# Altium PCB KPILL.PcbDoc
Units mm, origin at the board's own origin, x right, y up, seen from the top; angles counter-clockwise.
Board outline 21.24 x 56 mm, 2 copper layers (Top Layer, Bottom Layer); 30 components, 46 nets, 154 pads, 21 vias.
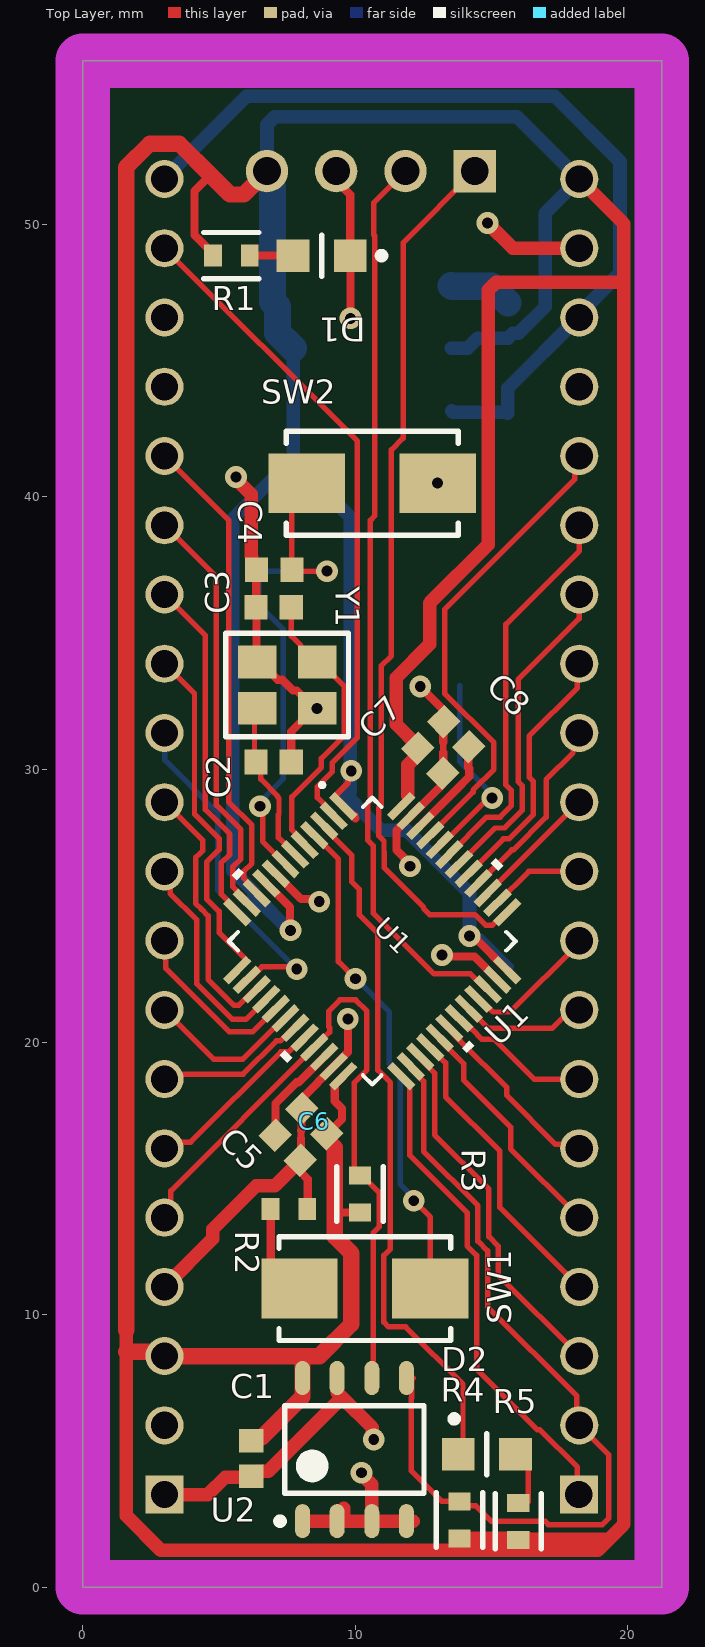
[diagram p0: Top Layer view]
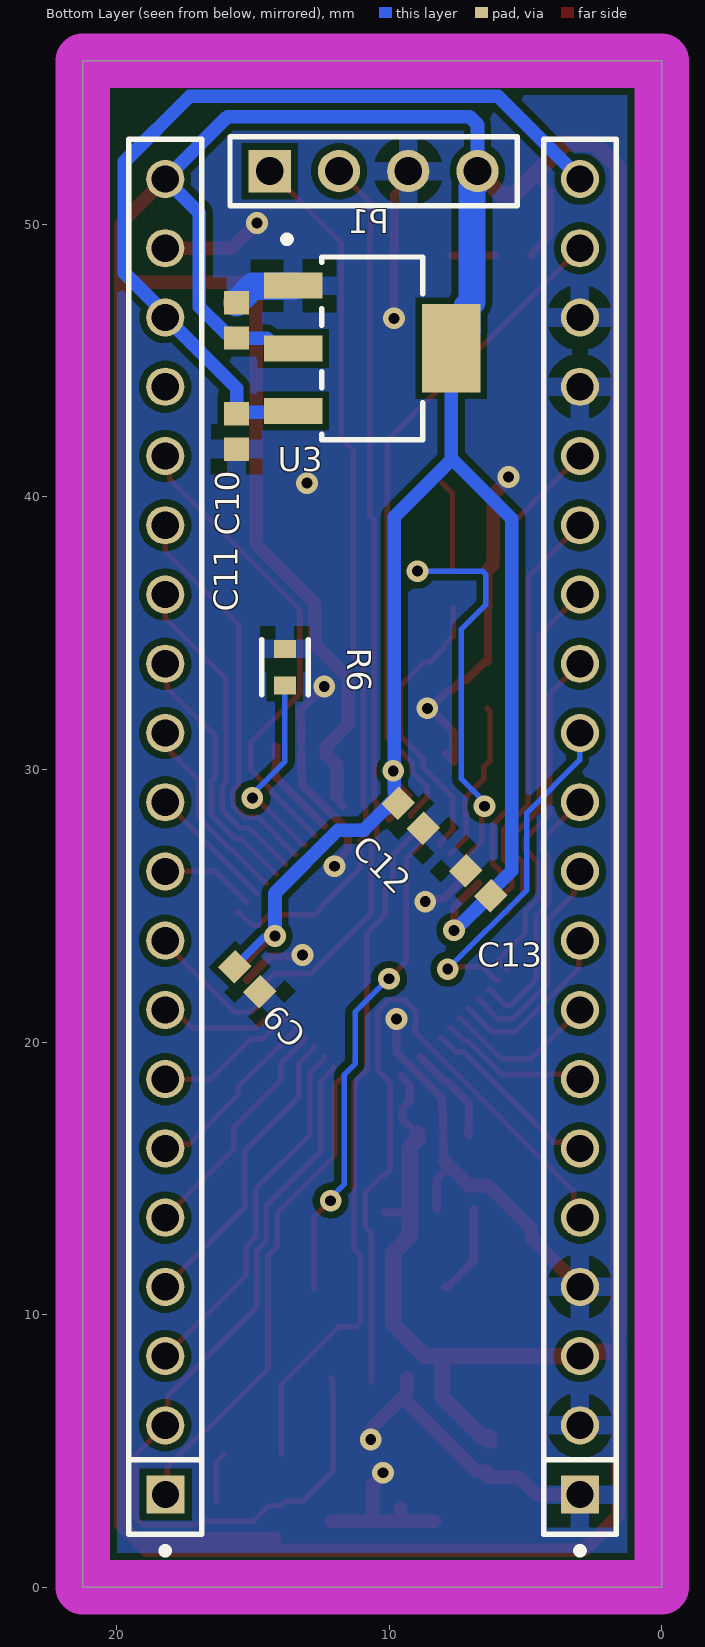
[diagram p1: Bottom Layer view, seen from below]
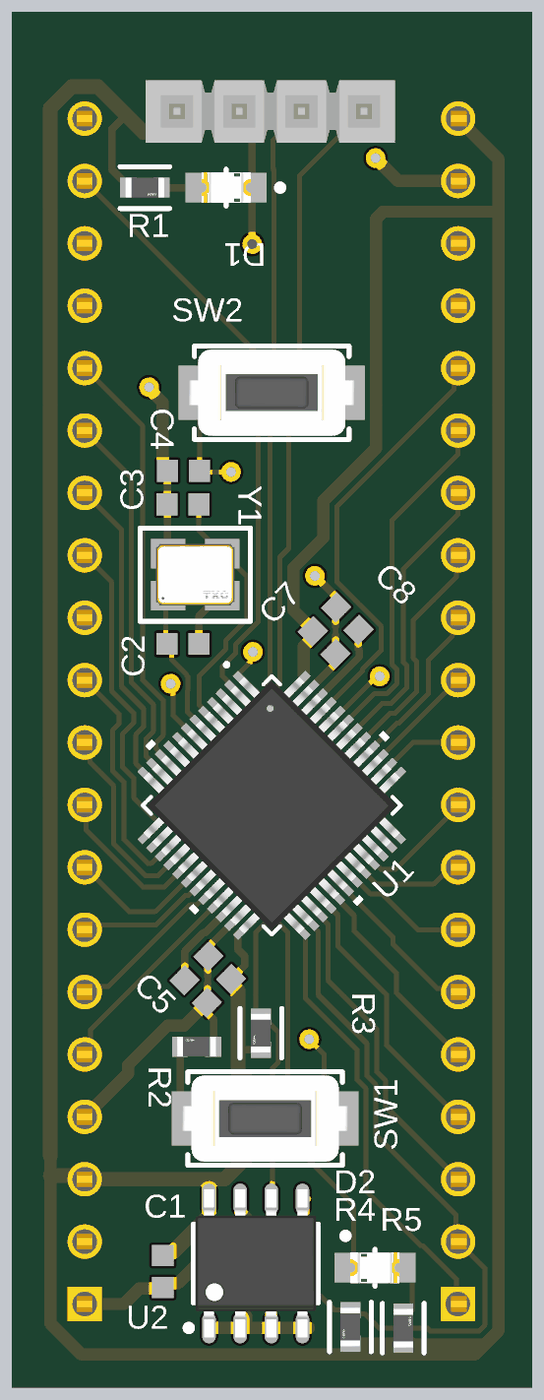
[diagram p2: 3D render of the assembled board from above, using the file's embedded part models]
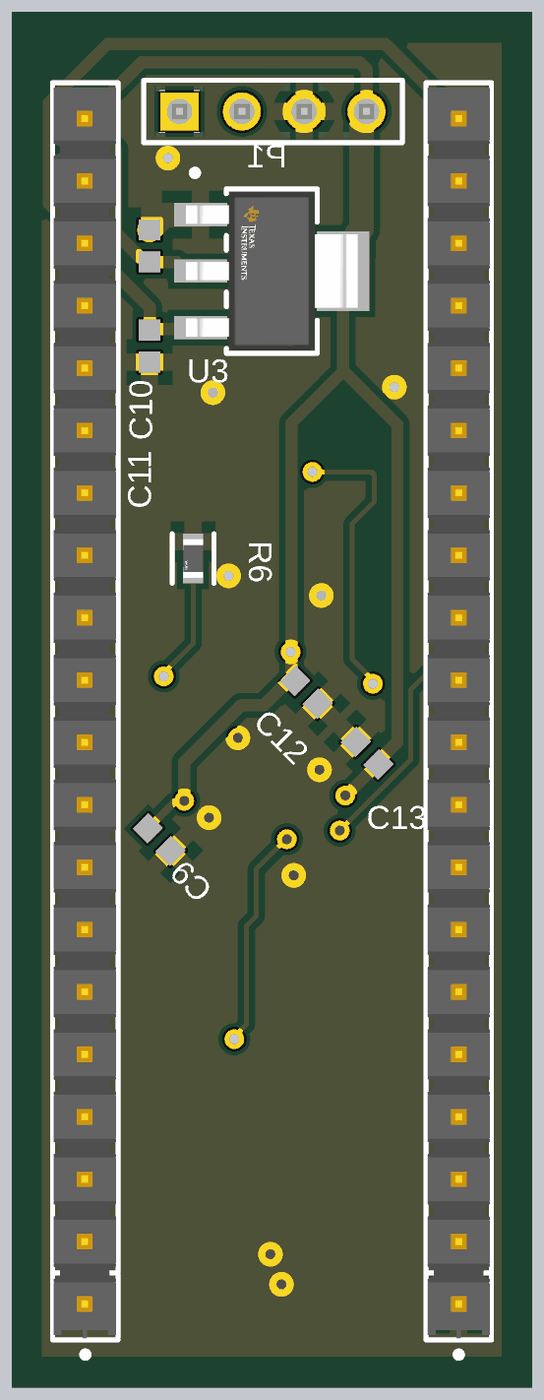
[diagram p3: 3D render of the assembled board from below, using the file's embedded part models]

## Layer stack, top to bottom
Top Solder: solder mask 0.0102, Solder Resist, Dk 3.5
Top Layer: signal copper 0.0356
Dielectric 1: dielectric 0.32, FR-4, Dk 4.8
Bottom Layer: signal copper 0.0356
Bottom Solder: solder mask 0.0102, Solder Resist, Dk 3.5

## Board outline
0,0 0,56 21.24,56 21.24,0

## Design rules (kind name [scope] priority, off if disabled: settings)
AcuteAngle [All] p1: minimum=7.50000000000000E+0001 checktracksonly=FALSE
BoardOutlineClearance [All] p1: gap=0.4 ignorepadtopadclearanceinfootprint=FALSE
Clearance "Stitching GND" [IsStitchingVia and InNet('GND') vs (IsVia and (Not IsStitchingVia)) Or IsPad] p1: gap=0.3 ignorepadtopadclearanceinfootprint=FALSE
Clearance Poly_Clearance [InPolygon] p2: gap=0.25 ignorepadtopadclearanceinfootprint=FALSE
Clearance [All] p3: gap=0.2 ignorepadtopadclearanceinfootprint=FALSE except(0.3: Arc-THPad Arc-Hole Track-THPad Track-Hole SMDPad-THPad SMDPad-Hole THPad-THPad THPad-Via THPad-Fill THPad-Poly THPad-Region THPad-Hole Via-Via Via-Fill Via-Poly Via-Region Via-Hole Fill-Hole Poly-Hole Region-Hole)
ComponentClearance [All] p1 off: gap=0.254 collisioncheckmode=3 verticalgap=0.254 showdistances=FALSE
ComponentOrientations [HasFootprint('No Footprint')] p1: allowedrotations=1
HoleSize [All] p1: absolutevalues=TRUE maxlimit=50 minlimit=0.4 maxpercent=80.000 minpercent=20.000
HoleToHoleClearance [All] p1: gap=0.3 allowstackedmicrovias=TRUE
MinimumAnnularRing [All] p1: minimumring=0.2
MinimumSolderMaskSliver [All] p1: minsoldermaskwidth=0.2
NetsToIgnore [All] p1:
PasteMaskExpansion [All] p1: expansion=0 thpadusetoppaste=TRUE percent=15.000000
PlaneConnect [All] p1: pad.planeconnectstyle=Relief pad.reliefexpansion=0.5 pad.reliefentries=4 pad.reliefconductorwidth=0.7 pad.reliefairgap=0.5 via.planeconnectstyle=Direct via.reliefexpansion=0.508 via.reliefentries=4 via.reliefconductorwidth=0.254 via.reliefairgap=0.254
PolygonConnect [All] p1: thpad.connectstyle=Relief thpad.reliefconductorwidth=0.7 thpad.reliefentries=4 thpad.polygonreliefangle="90 Angle" thpad.airgapwidth=0.5 smdpad.connectstyle=Relief smdpad.reliefconductorwidth=0.7 smdpad.reliefentries=4 smdpad.polygonreliefangle="90 Angle" smdpad.airgapwidth=0.5 via.connectstyle=Direct via.reliefconductorwidth=0.5 via.reliefentries=4 via.polygonreliefangle="45 Angle" via.airgapwidth=0.3
PolygonConnect PolygonBotLayer [All vs InPolygon] p2: thpad.connectstyle=Relief thpad.reliefconductorwidth=0.7 thpad.reliefentries=4 thpad.polygonreliefangle="90 Angle" thpad.airgapwidth=0.5 smdpad.connectstyle=Relief smdpad.reliefconductorwidth=0.7 smdpad.reliefentries=4 smdpad.polygonreliefangle="90 Angle" smdpad.airgapwidth=0.5 via.connectstyle=Direct via.reliefconductorwidth=0.254 via.reliefentries=4 via.polygonreliefangle="90 Angle" via.airgapwidth=0.254
PolygonConnect PolygonTopLayer [All vs InPolygon] p3: thpad.connectstyle=Relief thpad.reliefconductorwidth=0.7 thpad.reliefentries=4 thpad.polygonreliefangle="90 Angle" thpad.airgapwidth=0.5 smdpad.connectstyle=Relief smdpad.reliefconductorwidth=0.7 smdpad.reliefentries=4 smdpad.polygonreliefangle="90 Angle" smdpad.airgapwidth=0.5 via.connectstyle=Direct via.reliefconductorwidth=0.254 via.reliefentries=4 via.polygonreliefangle="90 Angle" via.airgapwidth=0.254
RoutingCorners [InNet('No Net')] p1: cornerstyle=45-Degree minsetback=2.54 maxsetback=2.54
RoutingVias [All] p1: holewidth=0.5 width=0.9 viastyle="Through Hole" minholewidth=0.4 minwidth=0.8 maxholewidth=2 maxwidth=3
SilkToSilkClearance [All] p1: silktosilkclearance=0
SilkToSolderMaskClearance [IsPad] p1: minsilkscreentomaskgap=0.2 clearancetoexposedcopper=TRUE
SolderMaskExpansion [All] p1: expansion=0.102 istentingtop=FALSE useseparateexpansions=TRUE expansionbottom=0.102 istentingbottom=FALSE
SupplyNets "Schematic Supply Nets_2" [InNet('+3V3')] p1: voltage=0.000
SupplyNets "Schematic Supply Nets_1" [InNet('+5')] p2: voltage=0.000
SupplyNets "Schematic Supply Nets" [InNet('GND')] p3: voltage=0.000
UnRoutedNet [All] p1: checkbadconnections=TRUE
Width [All] p1: maxlimit=10 minlimit=0.2 preferedwidth=0.254
20 further rules are at their usual default settings.

## Classes and differential pairs
component class KPILL: C1 C3 C5 C6 C7 C8 C9 C13 D2 J1 J2 P1 R2 R3 R6 SW2 U2 Y1

## Components (designator, comment, footprint, x,y, rotation, side; value= is the part's Value field where it differs from the comment)
C1 "100nF" CAPC1608X90X35LL15T15 6.182,4.725 r90 top
C2 "10pF" CAPC1608X90X35LL15T15 7,30.275 r180 top locked
C3 "10pF" CAPC1608X90X35LL15T15 7,35.95 r180 top locked
C4 "100nF" CAPC1608X90X35LL15T15 7.025,37.325 r180 top
C5 "2.2uF" CAPC1608X90X35LL15T15 7.525,16.127 r135 top locked
C6 "100nF" CAPC1608X90X35LL15T15 8.5,17.095 r315 top locked
C7 "100nF" CAPC1608X90X35LL15T15 12.75,30.325 r135 top locked
C8 "2.2uF" CAPC1608X90X35LL15T15 13.7,31.3 r315 top locked
C9 "100nF" CAPC1608X90X35LL15T15 15.203,22.306 r45 bottom
C10 "2.2uF" CAPC1608X90X35LL15T15 15.6,46.475 r270 bottom
C11 "2.2uF" CAPC1608X90X35LL15T15 15.6,42.4 r90 bottom
C12 "100nF" CAPC1608X90X35LL15T15 9.206,28.296 r45 bottom
C13 "100nF" CAPC1608X90X35LL15T15 6.731,25.821 r225 bottom
D1 "SML-LX0805UWC-TR" FP-SML-LX0805UWC-TR-MFG 8.76,48.85 r180 top
D2 "SML-LX0805UWC-TR" FP-SML-LX0805UWC-TR-MFG 14.825,4.875 r0 top
J1 "TSW-120-05-G-S" FP-TSW-120-05-G-S-MFG#1 18.215,27.53 r90 bottom locked
J2 "TSW-120-05-G-S" FP-TSW-120-05-G-S-MFG#2 3,27.53 r90 bottom locked
P1 "MTSW-104-07-G-S-170" SMTC-MTSW-104-07-X-S-170 14.377,51.95 r180 bottom locked
R1 "10K" FP-AT0603-IPC_C 5.45,48.85 r0 top
R2 "10K" FP-AT0603-IPC_C 7.559,13.875 r180 top
R3 "10K" FP-AT0603-IPC_C 10.175,14.425 r270 top
R4 "10K" FP-AT0603-IPC_C 13.822,2.465 r270 top
R5 "10K" FP-AT0603-IPC_C 15.977,2.417 r90 top
R6 "10K" FP-AT0603-IPC_C 13.825,33.75 r270 bottom
SW1 "USER" FP-147873-2-MFG 10.35,10.952 r180 top locked
SW2 "Reset Button" FP-147873-2-MFG 10.62,40.5 r0 top
U1 "STM32H503CBT6" LQFP48-7x7mm_STM 10.62,23.7 r315 top locked
U2 "AT24C512C-SSHD-T" ATML-8S1_L 9.968,5.051 r90 top
U3 "TLV76133DCYR" FP-DCY0004A-MFG 10.619,45.45 r180 bottom
Y1 "7M16000025" FP-7M-MFG 7.5,33.094 r0 top locked

## Footprints (in the part's own frame and the unit in brackets; to place one, negate y for a bottom-side part, rotate by r counter-clockwise, add the part's x,y. Pads: shape width x height; smd on the part's side, far side on the other; paste and mask are expansions set on the pad)
ATML-8S1_L [mm] "SOIC, 8-Leads, Body 5.1x4mm, Pitch 1.27mm, IPC High Density"
  oval 1.25x0.55 smd: 1(-2.625,1.905) 2(-2.625,0.635) 3(-2.625,-0.635) 4(-2.625,-1.905) 5(2.625,-1.905) 6(2.625,-0.635) 7(2.625,0.635) 8(2.625,1.905)
  silkscreen extent -2.75,-2.55 1.6,2.85, body extent -3.01,-2.46 3.01,2.46, height 1.75
CAPC1608X90X35LL15T15 [mm] "Chip Capacitor, 2-Leads, Body 1.60x0.81mm, IPC High Density"
  rect 0.85x0.9 smd: 1(-0.65,0) 2(0.65,0)
  body extent -0.88,-0.48 0.87,0.48, height 0.9
FP-7M-MFG [mm]
  rect 1.4x1.2 smd paste+0 mask+0: 1(-1.1,-0.85) 2(1.1,-0.85) 3(1.1,0.85) 4(-1.1,0.85)
  silkscreen extent -2.25,-1.9 2.25,1.9, body extent -1.9,-1.55 1.9,1.55, height 0.25
FP-147873-2-MFG [mm]
  rect 2.8x2.2 smd paste+0 mask+0: 1(-2.4,0) 2(2.4,0)
  silkscreen extent -3.15,-1.9 3.15,1.9, body extent -3.9,-2 3.9,2, height 0.25
FP-AT0603-IPC_C [mm]
  rect 0.659x0.812 smd paste+0 mask+0: 1(-0.677,0) 2(0.677,0)
  silkscreen extent -1.01,-0.85 1.01,0.85, body extent -1.11,-0.55 1.11,0.55, height 0.25
FP-DCY0004A-MFG [mm]
  rect 2.15x0.95 smd paste+0 mask+0: 1(-2.9,2.3) 2(-2.9,0) 3(-2.9,-2.3)
  rect 2.15x3.25 smd paste+0 mask+0: 4(2.9,0)
  silkscreen extent -3.26,-3.35 1.85,4.12, body extent -3.5,-3.25 3.5,3.25, height 1.8
FP-SML-LX0805UWC-TR-MFG [mm]
  rect 1.2x1.2 smd paste+0 mask+0: 1(-1.05,0) 2(1.05,0)
  silkscreen extent -2.33,-0.75 0,0.75, body extent -1.75,-0.85 1.75,0.85, height 0.25
FP-TSW-120-05-G-S-MFG#1 [mm]
  rect 1.4x1.4 hole 1 paste-2539.97 mask+0: 1(-24.13,-0.015)
  round 1.4 hole 1 paste-2539.97 mask+0: 2(-21.59,0) 3(-19.05,0) 4(-16.51,0) 5(-13.97,0) 6(-11.43,0) 7(-8.89,0) 8(-6.35,0) 9(-3.81,0) 10(-1.27,0) 11(1.27,0) 12(3.81,0) 13(6.35,0) 14(8.89,0) 15(11.43,0) 16(13.97,0) 17(16.51,0) 18(19.05,0) 19(21.59,0) 20(24.13,0)
  silkscreen extent -26.31,-1.34 25.59,1.34, body extent -25.53,-1.25 25.4,1.3, height 5.54
FP-TSW-120-05-G-S-MFG#2 [mm]
  rect 1.4x1.4 hole 1 paste-2539.97 mask+0: 1(-24.13,0)
  round 1.4 hole 1 paste-2539.97 mask+0: 2(-21.59,0) 3(-19.05,0) 4(-16.51,0) 5(-13.97,0) 6(-11.43,0) 7(-8.89,0) 8(-6.35,0) 9(-3.81,0) 10(-1.27,0) 11(1.27,0) 12(3.81,0) 13(6.35,0) 14(8.89,0) 15(11.43,0) 16(13.97,0) 17(16.51,0) 18(19.05,0) 19(21.59,0) 20(24.13,0)
  silkscreen extent -26.31,-1.33 25.59,1.34, body extent -25.53,-1.27 25.4,1.27, height 5.54
LQFP48-7x7mm_STM [mm]
  rect 1.194x0.3 smd paste+0 mask+0: 1(-4.25,2.75) 2(-4.25,2.25) 11(-4.25,-2.25) 12(-4.25,-2.75) 25(4.25,-2.75) 26(4.25,-2.25) 27(4.25,-1.75) 31(4.25,0.25)
  rect 1.194x0.295 smd paste+0 mask+0: 3(-4.25,1.75) 4(-4.25,1.25) 5(-4.25,0.75) 6(-4.25,0.25) 7(-4.25,-0.25) 8(-4.25,-0.75) 9(-4.25,-1.25) 10(-4.25,-1.75)
  rect 0.295x1.194 smd paste+0 mask+0: 13(-2.75,-4.25) 14(-2.25,-4.25) 15(-1.75,-4.25) 16(-1.25,-4.25) 17(-0.75,-4.25) 18(-0.25,-4.25) 19(0.25,-4.25) 20(0.75,-4.25) 21(1.25,-4.25) 22(1.75,-4.25) 23(2.25,-4.25) 24(2.75,-4.25) 40(1.25,4.25) 41(0.75,4.25) 44(-0.75,4.25) 45(-1.25,4.25)
  rect 1.194x0.29 smd paste+0 mask+0: 28(4.25,-1.25) 29(4.25,-0.75) 30(4.25,-0.25) 32(4.25,0.75) 33(4.25,1.25) 34(4.25,1.75) 35(4.25,2.25) 36(4.25,2.75)
  rect 0.3x1.194 smd paste+0 mask+0: 37(2.75,4.25) 38(2.25,4.25) 39(1.75,4.25) 42(0.25,4.25) 43(-0.25,4.25) 46(-1.75,4.25) 47(-2.25,4.25) 48(-2.75,4.25)
  silkscreen extent -5.43,-5.35 5.35,5.35, body extent -4.5,-4.5 4.5,4.5, height 1.6
SMTC-MTSW-104-07-X-S-170 [mm] "Assembly .025\" [.64] SQ Post Terminal Strip, 1x4 Pins, Vertical, 2.54mm Pitch, Male"
  rect 1.55x1.55 hole 1.02: 1(0,0)
  round 1.55 hole 1.02: 2(2.54,0) 3(5.08,0) 4(7.62,0)
  silkscreen extent -1.46,-1.27 9.08,1.27, body extent -1.27,-1.27 8.89,1.27, height 4.06

## Part data
C1 C2 C3 C4 C5 C6 C7 C8 C9 C10 C11 C12 C13: library part CMP-2006-04453-1, Manufacturer="AVX Interconnect / Elco", Part Number=06035C682KAT4A
D1 D2: library part CMP-00229-00139794-1, "SML-LX0805UWC-TR White LED, 0805 Diffused, Rectangle Lens SMD package", Case/Package=0805, Forward Current=20mA, Forward Voltage=3.5V, Illumination Color=White, Lens Color="Clear, Yellow", Max Operating Temperature=85°C, Min Operating Temperature=-40°C, Power Rating=120mW, Approvals="CSA, UL", Luminous Intensity=150mcd, Mount="Surface Mount", NexarPartId=139794, Number of LEDs=1, RoHS=Compliant, Viewing Angle=120°
J1 J2: library part CMP-00575-00271415-1, "TSW-120-05-G-S Headers & Wire Housings Classic PCB Header Strips, 0.100 pitch", Color=Black, Manufacturer Lifecycle Status=PRODUCTION, Connector Type="Male Pin", Contact Material=Bronze, Contact Mating Length=2.667mm, Contact Plating=Gold, Gender=Male, Height=2.54mm, Housing Color=Black, Housing Material=Plastic, Lead Free="Lead Free", Lead Pitch=2.54mm, Length=50.8mm, Lifecycle Status=Production, Mount="Through Hole", NexarPartId=271415, Number of Contacts=20, Number of Positions=20, Number of Rows=1, Pitch=2.54mm, REACH SVHC="No SVHC", RoHS=Compliant, Termination=Solder, Width=2.54mm
P1: library part CMP-1024-00104-1, "Modified .025\" SQ Post Header, Through-hole, Vertical, -55 to 125 degC, 2.54 mm Pitch, 4-Pin, Male, RoHS", Manufacturer=Samtec, Temperature Range="-55 to 125 degC", ComponentLink1Description="Manufacturer URL", ComponentLink1URL=http://www.samtec.com, ComponentLink2Description=Datasheet, ComponentLink2URL=http://www.samtec.com/documents/webfiles/pdf/MTSW.PDF, ComponentLink3Description="Package Specification", ComponentLink3URL=http://www.samtec.com/documents/webfiles/cpdf/MTSW-XXX-XX-X-X-XXXX-XX-XXX-MKT1.pdf, DatasheetVersion=F-214, Mounting Technology=Through-hole, Orientation=Vertical, PackageDescription="Assembly .025\" [.64] SQ Post Terminal Strip", PackageReference=MTSW-104-07-X-S-170, PackageVersion="BI, 2/1987", PartNumber=MTSW-104-07-G-S-170, Pitch="2.54 mm", RoHS=True
R1 R2 R3 R4 R5 R6: library part CMP-03412-014529-2, "Thin Film Chip Resistors Automotive Grade 10kΩ 0.5% 50ppm/°C 0603", Case Code (Imperial)=0603, Case Code (Metric)=1608, Max Operating Temperature=155°C, Max Power Dissipation=100mW, Min Operating Temperature=-55°C, Ratings=AEC-Q200, Resistance=10kR, Resistor Type="Thin Film", Temperature Coefficient=50ppm/°C, Tolerance=0.5%, Case/Package=0603, Features="Moisture Resistant", Height=0.022inch, Length=0.063inch, Number of Terminations=2, Packaging="Cut Tape", RoHS Compliant=Yes, Series=AT, Width=0.032inch
SW1 SW2: library part CMP-03402-000024-1, "SWITCH TACTILE SPST-NO 0.05A 24V", Case/Package=SMD/SMT, Color=Black, Contact Current Rating=50mA, Contact Resistance=100mR, Max Operating Temperature=85°C, Max Voltage Rating (DC)=12V, Min Operating Temperature=-35°C, Operating Force=1.77N, Package Quantity=1, Actuator Length=0.031inch, Actuator Material=Polyphenylene, Contact Material="Copper Alloy", Contact Plating=Silver, Current Rating=50mA, Depth=6.8mm, Electrical Life=40000Cycles, ELV=Compliant, Height=4.3mm, Housing Material=Thermoplastic, Illumination Type=Non-Illuminated, Lead Free="Lead Free", Length=3.5mm, Material=Polyamide, Max Current Rating=50mA, Mechanical Life=40000Cycles, Mount="Surface Mount", Orientation=Straight, Packaging="Tape and Reel", Radiation Hardening=No, RoHS Compliant=Yes, Series="FSMJM, Alcoswitch", Size=6mm, Switch Function=Off-Mom, Switch Travel=0.25mm, Termination=J-Bend, Throw Configuration=SPST, Type=Switch, Voltage Rating (DC)=12V
U1: "High-performance, Arm Cortex-M33, MCU with 128-Kbyte Flash, 32-Kbyte RAM, 250 MHz CPU", Manufacturer_Name=STMicroelectronics, Copyright="Copyright (C) 2025 Ultra Librarian. All rights reserved.", Manufacturer_Part_Number=STM32H503CBT6, RefDes=RefDes, Type=Type
U2: library part CMP-2000-05801-1, "512-Kbit (65,536 x 8), 2-Wire Bus Serial EEPROM with Write Protect, 2.5 to 5.5 V, -40 to 85 degC, 8-Pin SOIC (8S1), RoHS, Tape and Reel", Manufacturer=Atmel, Maximum Operating Frequency=1MHz, Operating Temperature=-40to85°C, Package=8SOIC, Package Description="8-Pin Small Outline Integrated Circuit, Body 4.925 x 3.9 mm, Pitch 1.27 mm", Package Reference=8S1, Typical Operating Supply Voltage=3.3, Category=EEPROM, Data Retention=40Year, Datasheet URL=http://www.atmel.com/Images/Atmel-8720-SEEPROM-AT24C512C-Datasheet.pdf, Datasheet Version="Rev. 8720G, 09/2015", Density=512Kb, Hardware Data Protection=Yes, Interface Type=Serial(2-Wire), Manufacturer URL=http://www.atmel.com/, Maximum Random Access Time=550ns, Mounting Technology=SurfaceMount, Organization=64Kx8
U3: library part CMP-00370-135533165-1, "TLV76133DCYR 1A 16V high-PSRR linear voltage regulator 4-SOT-223 -40 to 125", Case/Package=SOT-223, Dropout Voltage=900mV, Manufacturer Lifecycle Status=ACTIVE, Max Junction Temperature (Tj)=125°C, Max Supply Voltage=16V, Min Operating Temperature=-40°C, Min Supply Voltage=4.8V, Nominal Supply Current=65µA, Output Current=1A, Output Voltage=3.3V, Accuracy=1%, ComponentLink1Description="Supplier Link", ComponentLink1URL=https://lionelectronic.ir/products/6357-TLV76133DCYR, Height=1.8mm, Length=6.5mm, Lifecycle Status=Production, Max Operating Temperature=125°C, NexarPartId=135533165, Number of Outputs=1, Number of Pins=4, P.N=TLV76133DCYR, Thickness=1.6mm, Width=3.5mm
Y1: library part CMP-18717-000306-1, "Crystal 16MHz, 10ppm, 20pF, 60Ω", Case/Package=SMD/SMT, Frequency=16MHz, Frequency Stability=10ppm, Load Capacitance=20pF, Max Operating Temperature=70°C, Min Operating Temperature=-20°C, Frequency Tolerance=10ppm, Height=0.031inch, Length=0.126inch, Mount="Surface Mount", Width=0.098inch

## Via types
v1: diameter 0.8, hole 0.4, Top Layer to Bottom Layer, 21 vias

## Nets (pads, with @x,y where several pads share a name; then routed paths per layer and width w, separated by ;. In a path a pad name is that pad's centre, name@x,y a point inside that pad or via, vN(x,y) a via of type N, cw(c..) or ccw(c..) an arc to the next point about the centre after c; other vN are vias at no path point)
+3V3: C1.2 C6.2 C7.2 C9.2 C10.2 C12.2 C13.2 J1.20 J2.3 P1.4 R1.1 R3.2 R4.2 R5.1 U1.1 U1.9 U1.24 U1.36 U1.48 U2.8 U3.2 U3.4 | length 268.5
  Top Layer w0.219: U1.1@9.551,28.715 9.243,29.023 9.739,29.519 9.739,29.839 v1(9.85,29.95) ; U1.1 U1.1@9.559,28.655 ; 10.002,28.207 U1.1@10.002,28.334
  Top Layer w0.3: 4.687,51.812 4.1,51.225 4.1,49.6 4.773,48.927 R1.1 ; U1.9 7.255,25.297 7.602,24.95 7.602,24.123 v1(7.625,24.1) ; C6.2 8.942,16.617 8.942,16.229 9.084,16.086 ; C6.2@9.047,16.703 9.513,17.168 9.513,17.565 9.243,17.834 9.243,18.434 U1.24 ; 9.25,13.75 9.252,13.748 R3.2 ; U1.1 10.002,28.207 ; U1.48 11.922,28.891 U1.48@11.922,29.032 ; v1(14.186,23.886) 14.282,23.79 14.419,23.79 U1.36
  Top Layer w0.5: 1.6,9.43 1.6,8.633 1.6,2.622 2.871,1.351 18.894,1.351 19.293,1.75 ; U1.48@11.922,29.032 11.922,30.168 12.308,30.555 12.308,30.848 11.5,31.656 11.5,33.368 12.725,34.593 12.725,36.103 14.87,38.248 14.87,47.577 15.163,47.87 19.85,47.87 ; R4.2@14.175,1.788 16.35,1.788 16.388,1.75 19.293,1.75 ; J1.20 19.815,50.06 ; 19.85,48.937 19.85,47.87 ; 19.85,48.987 19.85,50.025 ; 19.293,1.75 19.85,2.306 19.85,47.87
  Top Layer w0.6: 1.6,8.633 2.847,8.633 J2.3 8.063,8.48 ; 1.6,9.43 1.6,52.098 2.462,52.96 3.538,52.96 4.687,51.812 5.404,51.094 5.902,51.094 P1.4 ; C1.2@6.332,5.375 6.332,5.5 6.575,5.5 8.063,6.988 8.063,8.48 ; C6.2 8.942,16.617 8.942,16.441 9.25,16.133 9.25,13.75 9.25,12.859 9.85,12.259 9.85,9.644 8.686,8.48 8.063,8.48
  Bottom Layer w0.3: v1(9.85,29.95) 9.85,29.021 10.116,28.756 10.116,28.553 ; v1(14.186,23.886) 14.243,23.829 14.6,23.829 C9.2
  Bottom Layer w0.5: P1.4 6.758,53.657 7.05,53.95 15.925,53.95 J1.20 16.965,50.41 16.965,46.979 15.986,46 15.775,46 C10.2 14.494,45.825 14.119,45.45 U3.2 ; v1(7.625,24.1) 7.579,24.1 6.317,25.362 C13.2 6.271,25.516 5.5,26.287 5.5,39.2 7.719,41.419 ; U3.4 7.719,41.419 ; v1(14.186,23.886) 14.186,25.466 11.882,27.77 10.943,27.77 10.16,28.553 10.116,28.553 9.913,28.756 C12.2 9.648,28.773 9.648,29.021 9.811,29.185 9.811,39.264 7.719,41.356 7.719,41.419
  Bottom Layer w1: P1.4 6.863,51.845 6.863,51.456 6.962,51.356 6.962,47.161 7.144,46.979 7.144,46.025 U3.4
+5: C11.2 J1.18 J2.20 U3.3 | length 32
  Bottom Layer w0.5: J2.20@3,51.692 6.008,54.7 17.315,54.7 19.708,52.306 19.708,48.213 18.208,46.713 J1.18@18.208,46.587 ; U3.3@13.537,43.15 13.587,43.1 15.568,43.1 15.593,43.075 15.593,43.985 J1.18@18.188,46.58
B7: J1.15 U1.43 | length 14.5
  Top Layer w0.2: U1.43 14.819,28.253 15.31,28.253 15.72,28.663 15.72,29.243 15.525,29.438 15.525,35.325 18.215,38.015 J1.15
B8: J1.16 U1.45 | length 17.7
  Top Layer w0.2: U1.45 14.32,29.167 14.32,29.243 15.078,30.002 15.078,30.982 13.275,32.786 13.275,35.875 18.05,40.65 18.05,41.335 J1.16
GND: C1.1 C2.1 C3.2 C4.2 C5.1 C6.1 C7.1 C8.1 C9.1 C10.1 C11.1 C12.1 C13.1 D1.1 J1.19 J2.1 J2.2 J2.4 J2.17 J2.18 P1.3 R2.1 R6.1 SW2.2 U1.8 U1.23 U1.35 U1.47 U2.1 U2.2 U2.3 U2.4 U2.7 U3.1 Y1.2 Y1.4 | length 68.6
  Top Layer w0.232: 13.223,30.999 13.225,30.997 13.225,30.692 13.227,30.69 13.227,30.626
  Top Layer w0.257: 8.012,16.468 8.012,16.753
  Top Layer w0.3: C4.2@6.363,37.313 6.363,35.963 C3.2 6.375,35.925 6.375,33.969 Y1.4 ; Y1.4@6.5,33.944 7.15,33.294 7.314,33.294 7.714,32.894 7.85,32.894 Y1.2@8.5,32.244 ; U1.8 8.014,25.246 8.579,25.246 v1(8.675,25.15) ; C2.1 C2.1@7.65,30.3 ; C2.1@7.925,30.575 C2.1@7.65,30.3 ; C5.1 7.967,15.65 7.967,15.261 8.252,14.976 R2.1@8.252,13.875 ; C5.1@8.002,15.685 8.002,16.458 8.012,16.468 ; 8.012,16.753 8.023,16.764 8.023,17.517 C6.1@8.04,17.535 ; C6.1@8.058,17.552 8.058,17.956 U1.23 9.73,19.628 9.73,20.845 v1(9.725,20.85) ; v1(8.6,32.244) Y1.2@8.5,32.244 ; P1.3 9.298,51.612 9.81,51.099 D1.1 9.825,48.835 v1(9.825,46.55) ; v1(12,26.45) 12,26.558 11.51,27.049 11.51,27.772 U1.47 13.192,29.454 13.192,29.848 C7.1 13.227,29.883 13.227,30.626 ; v1(12.38,33.045) 13.258,32.166 13.258,31.777 C8.1 13.223,31.742 13.223,30.999 ; v1(13.175,23.2) 13.239,23.136 14.366,23.136 U1.35 ; C2.1@7.65,30.3 7.65,31.394 Y1.2@8.5,32.244
  Top Layer w0.5: J2.1 4.587,3.4 5.225,4.038 C1.1@6.388,4.038 ; J2.4 4.769,12.789 4.769,13.134 6.366,14.731 7.048,14.731 C5.1@7.967,15.65 ; v1(5.625,40.725) 5.625,40.644 6.175,40.094 6.175,37.818 6.2,37.793 6.2,37.5 C4.2 ; C1.1@6.382,4.038 6.382,4.25 6.8,4.25 9.513,6.963 9.343,7.132 9.343,7.666 U2.7 ; U2.1@8.32,2.426 U2.2 9.576,2.426 U2.2@9.576,2.901 ; 9.548,6.927 10.618,5.857 10.618,5.482 v1(10.675,5.425) ; U2.2@9.59,2.426 U2.3 ; v1(10.225,4.2) 10.225,4.147 10.603,3.769 U2.3 ; U2.4@12.13,2.426 U2.4 U2.3 ; v1(14.85,50.05) 15.78,49.12 J1.19
  Bottom Layer w1: U3.1 13.544,47.725 15,47.725 C10.1
  other v1: 13.017,40.503
MCU_NRST: C4.1 SW2.1 U1.7 | length 18.9
  Top Layer w0.2: v1(6.5,28.65) 6.6,28.55 6.6,27.366 U1.7 ; SW2.1@8.05,40.5 7.675,40.125 C4.1 7.725,37.275 v1(8.961,37.275)
  Bottom Layer w0.2: v1(6.5,28.65) 6.5,28.8 7.35,29.65 7.35,35.15 6.45,36.05 6.45,37.158 6.567,37.275 v1(8.961,37.275)
MCU_OSC_IN: C3.1 U1.5 Y1.3 | length 10.6
  Top Layer w0.2: C3.1 7.65,34.894 8,34.544 8,34.444 8.5,33.944 Y1.3 8.7,33.944 9.6,33.044 9.6,31.256 8.75,30.406 8.75,30.076 7.671,28.996 7.671,27.781 8.145,27.306 U1.5
MCU_OSC_OUT: C2.2 U1.6 Y1.1 | length 6
  Top Layer w0.2: C2.2@6.3,30.275 6.3,32.144 Y1.1 ; C2.2 6.533,30.092 6.533,29.642 7.15,29.025 7.15,28.99 7.2,28.94 7.2,28.36 7.177,28.337 7.177,27.496 U1.6
NetD1_2: D2.2 R5.2 | length 1.9
  Top Layer w0.2: D2.2@16.05,4.875 16.35,4.575 R5.2@16.35,3.141
NetD2_2: D1.2 R1.2 | length 1.6
  Top Layer w0.3: R1.2 D1.2
NetR3_2: R2.2 SW1.2 | length 3.3
  Top Layer w0.3: R2.2@6.898,13.875 6.898,11.975 7.848,11.025 SW1.2@7.95,11.025
NetR4_2: R6.2 U1.44 | length 7.3
  Top Layer w0.2: U1.44 13.166,27.236 14.883,28.953 v1(15.02,28.953)
  Bottom Layer w0.2: R6.2 13.825,30.287 15.02,29.092 v1(15.02,28.953)
PA0: J2.16 U1.10 | length 17.7
  Top Layer w0.2: J2.16 5.35,39.15 5.35,28.81 6.2,27.96 6.2,26.559 5.903,26.262 5.903,26.013 6.377,25.538 U1.10
PA1: J2.15 U1.11 | length 15.3
  Top Layer w0.2: J2.15 4.9,37.06 4.9,28.694 5.8,27.794 5.8,26.724 5.503,26.427 5.503,25.706 6.024,25.185 U1.11
PA2: J2.14 U1.12 | length 13
  Top Layer w0.2: J2.14 4.5,34.92 4.5,28.529 5.4,27.629 5.4,26.89 5.075,26.565 5.075,25.426 5.67,24.831 U1.12
PA3: J2.13 U1.13 | length 13
  Top Layer w0.2: J2.13 4.1,32.78 4.1,28.363 5,27.463 5,27.056 4.543,26.599 4.543,25.251 5,24.795 5,24.012 5.986,23.026 5.986,22.955 U1.13
PA4: J2.12 U1.14 | length 12.7
  Top Layer w0.2: U1.14 6.095,22.286 6.569,22.76 7.765,22.76 v1(7.85,22.675)
  Bottom Layer w0.2: J2.12 3.016,31.324 3.016,30.34 4.95,28.406 4.95,25.575 v1(7.85,22.675)
PA5: J2.11 U1.15 | length 9.8
  Top Layer w0.2: J2.11 4.396,27.404 4.396,27.017 4.303,26.924 4.143,26.765 4.143,25.086 4.349,24.88 4.6,24.629 4.6,22.3 5.554,21.346 5.72,21.346 6.307,21.932 U1.15
PA6: J2.10 U1.16 | length 8
  Top Layer w0.2: J2.10 3.209,26.051 3.209,25.454 4.175,24.488 4.175,22.141 5.485,20.831 5.983,20.831 U1.16
PA7: J2.9 U1.17 | length 6.4
  Top Layer w0.2: J2.9 3.049,23.671 3.049,22.701 5.375,20.375 6.234,20.375 U1.17
PA8: J1.5 U1.29 | length 8.7
  Top Layer w0.2: U1.29 13.095,20.094 13.975,19.214 13.975,18.6 15.698,16.877 15.698,16.077 J1.5
PA9: J1.6 U1.30 | length 6.8
  Top Layer w0.2: U1.30 13.448,20.447 13.847,20.048 15.557,18.338 15.557,18.043 17.35,16.25 18.065,16.25 J1.6
PA10: J1.7 U1.31 | length 5.3
  Top Layer w0.2: U1.31 13.873,20.872 14.272,20.473 14.644,20.1 15.1,20.1 16.56,18.64 J1.7
PA11: J1.8 U1.32 | length 4.6
  Top Layer w0.2: U1.32 14.881,20.5 17.21,20.5 17.89,21.18 J1.8
PA12: J1.9 U1.33 | length 5
  Top Layer w0.2: U1.33 14.58,21.579 15.054,21.104 15.679,21.104 18.215,23.64 J1.9
PA15: J1.10 U1.38 | length 3.5
  Top Layer w0.2: U1.38 16.362,26.26 J1.10
PB0: J2.8 U1.18 | length 5.8
  Top Layer w0.2: J2.8 4.805,19.375 5.871,19.375 7.367,20.872 U1.18
PB1: J2.7 U1.19 | length 5.6
  Top Layer w0.2: J2.7 3.185,18.825 5.886,18.825 7.105,20.043 7.246,20.043 7.721,20.518 U1.19
PB2: J2.6 U1.20 | length 6.8
  Top Layer w0.2: J2.6 3.23,16.33 3.957,16.33 7.271,19.643 7.553,19.643 8.074,20.164 U1.20
PB3: J1.11 U1.39 | length 4.7
  Top Layer w0.2: U1.39 14.873,25.468 18.205,28.8 J1.11
PB4: J1.12 U1.40 | length 7.1
  Top Layer w0.2: U1.40 15.741,27.053 15.807,27.053 17.004,28.25 17.004,29.629 17.985,30.61 17.985,31.11 J1.12
PB5: J1.13 U1.41 | length 9.6
  Top Layer w0.2: U1.41 15.434,27.453 15.641,27.453 16.52,28.332 16.52,29.574 16.375,29.719 16.375,31.225 18.147,32.997 18.147,33.812 J1.13
PB6: J1.14 U1.42 | length 12
  Top Layer w0.2: U1.42 15.127,27.853 15.475,27.853 16.12,28.497 16.12,29.409 15.975,29.553 15.975,33.3 18.212,35.537 18.212,36.417 J1.14
PB10: J2.5 R3.1 U1.21 U2.6 | length 26.2
  Top Layer w0.2: J2.5 3.23,13.79 3.23,14.542 U1.21 9.054,20.366 9.054,20.531 9.025,20.56 9.025,21.14 9.435,21.55 10.015,21.55 10.425,21.14 10.425,18.98 9.963,18.517 9.963,15.314 R3.1 10.252,15.102 10.881,14.472 10.881,13.231 10.65,13 U2.6@10.65,7.541
PB12: J1.1 U1.25 | length 18.1
  Top Layer w0.2: U1.25 11.997,18.434 11.997,15.842 14.098,13.741 14.098,12.528 14.45,12.176 14.45,8 16.675,5.775 16.774,5.775 18.142,4.407 18.142,3.458 J1.1
PB13: J1.2 R4.1 U1.26 U2.5 | length 31.2
  Top Layer w0.2: U1.26 12.034,19.033 12.509,18.559 12.509,15.991 14.498,14.002 14.498,12.693 14.85,12.341 14.85,10.289 18.127,7.012 18.127,6.028 J1.2 19.3,4.855 19.3,2.534 19.066,2.3 17.085,2.3 16.967,2.417 14.986,2.417 14.411,2.992 13.982,2.992 13.822,3.152 13.173,3.152 12.055,4.27 12.055,6.95 12.063,6.958 12.063,7.609 U2.5@12.13,7.676
PB14: J1.3 U1.27 | length 13.4
  Top Layer w0.2: U1.27 12.388,19.387 12.909,18.866 12.909,16.591 14.898,14.602 14.898,12.859 15.25,12.507 15.25,11.445 J1.3
PB15: J1.4 U1.28 | length 11.1
  Top Layer w0.2: U1.28 12.741,19.807 13.309,19.24 13.309,17.991 15.298,16.002 15.298,13.937 J1.4
PBNON: J1.17
PC13: J2.19 U1.2 | length 24.6
  Top Layer w0.2: J2.19 10.075,42.045 10.075,31.165 9.15,30.24 9.15,29.91 8.608,29.369 8.608,28.964 9.206,28.367 U1.2
PC14: D2.1 U1.3 | length 25.7
  Top Layer w0.2: U1.3 8.852,27.872 9.875,26.849 9.875,25.875 10.15,25.6 10.15,24.665 10.825,23.99 10.825,18.97 11.281,18.513 11.281,12.407 11.05,12.176 11.05,9.727 11.226,9.552 11.848,9.552 13.95,7.45 D2.1@13.95,4.875
PC15: SW1.1 U1.4 | length 18.4
  Top Layer w0.2: U1.4 9.375,26.713 9.375,22.95 v1(10.003,22.321) ; v1@12.15,14.175 12.75,13.575 SW1.1
  Bottom Layer w0.2: v1@10,22.35 11.25,21.1 11.25,19.2 11.65,18.8 11.65,14.776 12.145,14.281 v1(12.145,14.18)
SWCLK: P1.1 U1.37 | length 32.7
  Top Layer w0.2: P1.1 11.75,49.322 11.75,42.154 11.32,41.724 11.32,34.171 10.95,33.801 10.95,28.697 10.852,28.599 10.852,27.573 11.052,27.374 11.052,26.973 11.06,26.965 11.06,26.4 12.5,24.96 12.5,24.9 12.725,24.675 14.387,24.675 14.776,24.286 15.024,24.286 15.499,24.761 U1.37
SWDIO: P1.2 U1.34 | length 33.3
  Top Layer w0.2: P1.2 10.675,50.787 10.675,49.61 10.71,49.574 10.71,39.299 10.55,39.138 10.55,29.66 10.55,28.863 10.452,28.765 10.452,27.408 10.652,27.209 10.652,24.733 12.885,22.5 14.224,22.5 14.792,21.932 U1.34
VCAP_1: C5.2 U1.22 | length 3.7
  Top Layer w0.3: C5.2@7.065,16.585 7.083,16.602 7.083,16.991 7.072,17.003 7.072,17.748 7.847,18.523 7.918,18.523 U1.22
VCAP_2: C8.2 U1.46 | length 3.7
  Top Layer w0.3: U1.46 13.692,29.247 13.692,29.252 14.178,29.738 14.178,30.038 14.142,30.074 14.142,30.823 C8.2

## Polygon pours and split planes (outlines as drawn)
GND on Bottom Layer "GNDP" (solid, remove dead copper, pour order 0): 21.275,-0.025 21.175,0.075 21.175,55.975 -0.075,55.975 0.025,55.875 0.025,0.025

## Keep-outs
Keep-Out Layer:
  the board outline again, w2